# Altium PCB PCB.PcbDoc
Units mil, origin at the board's own origin, x right, y up, seen from the top; angles counter-clockwise.
Board outline 2055.12 x 472.44 mil, 2 copper layers (Top Layer, Bottom Layer), stack 61.811 mil thick; 6 components, 4 nets, 26 pads, 12 vias.
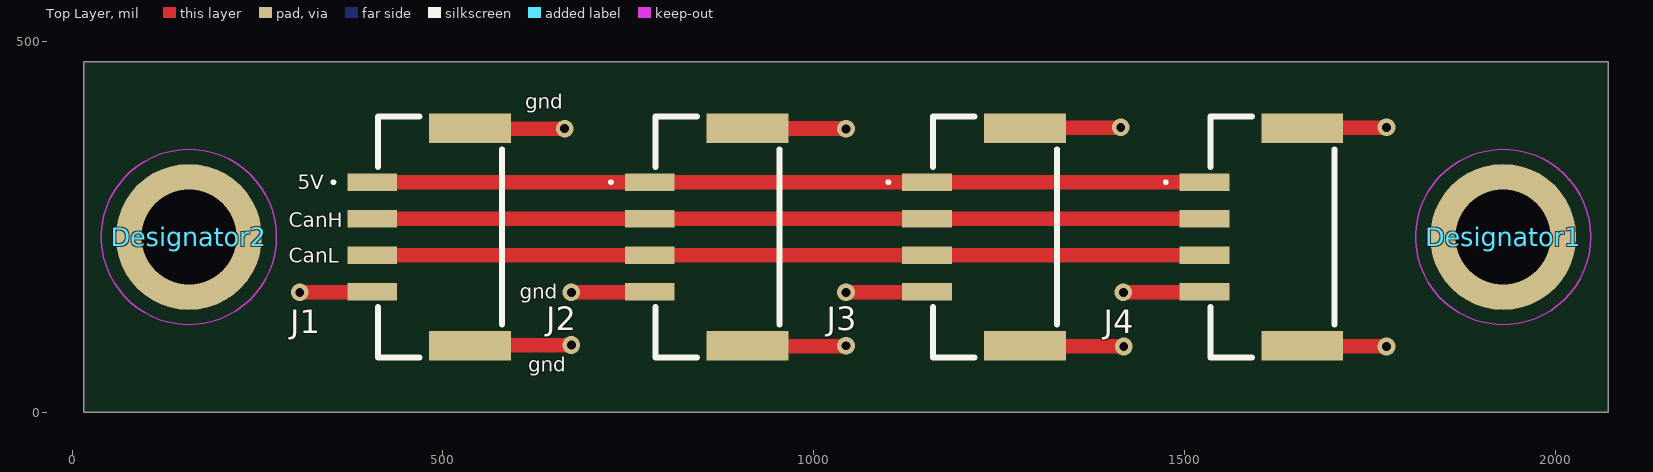
[diagram p0: Top Layer view]
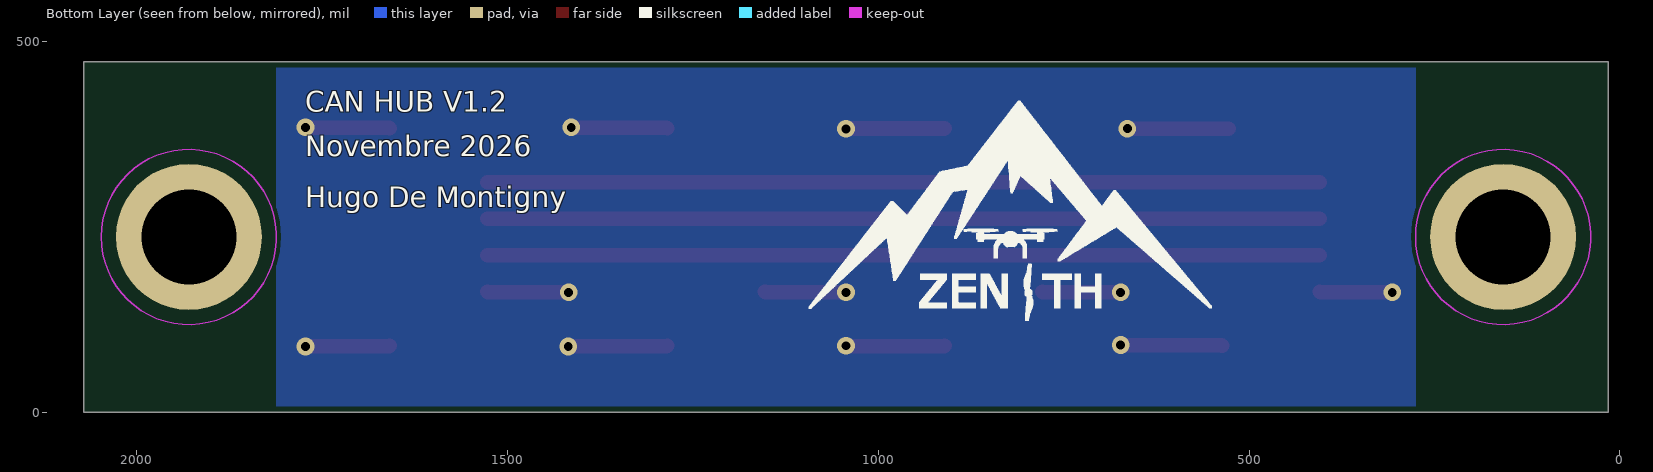
[diagram p1: Bottom Layer view, seen from below]
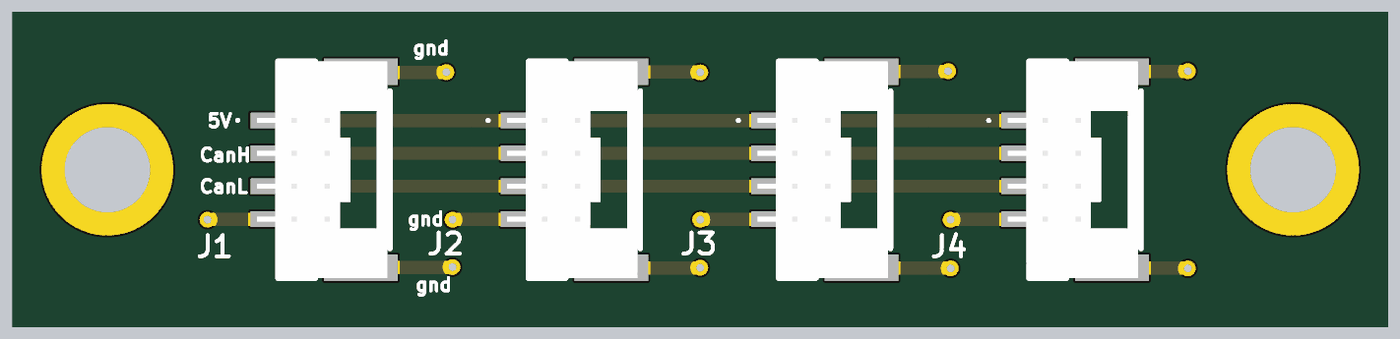
[diagram p2: 3D render of the assembled board from above, using the file's embedded part models]

## Layer stack, top to bottom
Top Solder: solder mask 0.5, Solder Resist, Dk 3.8
Top Layer: signal copper 1.378
Dielectric: core 59.0551, FR-4, Dk 4.5
Bottom Layer: signal copper 1.378
Bottom Solder: solder mask 0.5, Solder Resist, Dk 3.8

## Board outline
15.75,0 2070.87,0 2070.87,472.44 15.75,472.44

## Design rules (kind name [scope] priority, off if disabled: settings)
BoardOutlineClearance [All] p1: gap=7.87 ignorepadtopadclearanceinfootprint=FALSE
Clearance [All] p1: gap=5 ignorepadtopadclearanceinfootprint=FALSE except(9.84: Arc-Hole Track-Hole SMDPad-Hole THPad-Hole Via-Hole Fill-Hole Poly-Hole Region-Hole Text-Hole)
ComponentClearance [All] p1: gap=5 collisioncheckmode=3 verticalgap=5 showdistances=TRUE
DiffPairsRouting [All] p1: maxlimit=10 minlimit=5 mostfreqgap=5 toplayer_minwidth=5 toplayer_maxwidth=1000 toplayer_prefwidth=5 bottomlayer_minwidth=5 bottomlayer_maxwidth=1000 bottomlayer_prefwidth=5 maxuncoupledlength=500
Height [All] p1: minheight=0 maxheight=71497.94 prefheight=500
HoleSize [All] p1: absolutevalues=TRUE maxlimit=248.03 minlimit=11.81 maxpercent=80.000 minpercent=20.000
HoleToHoleClearance [All] p1: gap=9.84 allowstackedmicrovias=FALSE
MinimumAnnularRing [All] p1: minimumring=3
MinimumSolderMaskSliver [All] p1: minsoldermaskwidth=0
PlaneClearance [All] p1: clearance=5
PlaneConnect PlaneConnectPowerPads [InPadClass('PowerPads')] p1: planeconnectstyle=Direct reliefexpansion=20 reliefentries=4 reliefconductorwidth=10 reliefairgap=10
PlaneConnect [All] p2: pad.planeconnectstyle=Relief pad.reliefexpansion=11.81 pad.reliefentries=4 pad.reliefconductorwidth=5 pad.reliefairgap=5 via.planeconnectstyle=Direct via.reliefexpansion=11.81 via.reliefentries=4 via.reliefconductorwidth=5 via.reliefairgap=5
PolygonConnect PolygonConnectPowerPads [All vs (InPadClass('PowerPads'))] p1: connectstyle=Direct reliefconductorwidth=10 reliefentries=4 polygonreliefangle="90 Angle" airgapwidth=10
PolygonConnect [All] p2: thpad.connectstyle=Relief thpad.reliefconductorwidth=5 thpad.reliefentries=4 thpad.polygonreliefangle="90 Angle" thpad.airgapwidth=5 smdpad.connectstyle=Relief smdpad.reliefconductorwidth=5 smdpad.reliefentries=4 smdpad.polygonreliefangle="90 Angle" smdpad.airgapwidth=5 via.connectstyle=Direct via.reliefconductorwidth=5 via.reliefentries=4 via.polygonreliefangle="90 Angle" via.airgapwidth=5
RoutingVias [All] p1: holewidth=11.81 width=23.62 viastyle="Through Hole" minholewidth=11.81 minwidth=23.62 maxholewidth=23.62 maxwidth=259.84
SilkToSilkClearance [All] p1: silktosilkclearance=0
SilkToSolderMaskClearance [IsPad] p1: minsilkscreentomaskgap=3.94 clearancetoexposedcopper=TRUE
SolderMaskExpansion [All] p1: expansion=2.95 istentingtop=FALSE
SupplyNets "Schematic Supply Nets_1" [InNet('5V')] p1: voltage=0.000
SupplyNets "Schematic Supply Nets" [InNet('gnd')] p2: voltage=0.000
Width [All] p1: maxlimit=1000 minlimit=5 preferedwidth=5 minimp=50.000000 maximp=50.000000 favimp=50.000000
20 further rules are at their usual default settings.

## Classes and differential pairs
component class Schem: J1 J2 J3 J4

## Components (designator, comment, footprint, x,y, rotation, side; value= is the part's Value field where it differs from the comment)
Designator1 "Comment" "MH - Footprint" 1929.13,236.22 r0 top
Designator2 "Comment" "MH - Footprint" 157.48,236.22 r0 top
J1 "BM04B-GHS-TBT_LF__SN_" BM04BGHSTBTLFSN 492.13,236.22 r90 top
J2 "BM04B-GHS-TBT_LF__SN_" BM04BGHSTBTLFSN 866.14,236.22 r90 top
J3 "BM04B-GHS-TBT_LF__SN_" BM04BGHSTBTLFSN 1240.16,236.22 r90 top
J4 "BM04B-GHS-TBT_LF__SN_" BM04BGHSTBTLFSN 1614.17,236.22 r90 top

## Footprints (in the part's own frame and the unit in brackets; to place one, negate y for a bottom-side part, rotate by r counter-clockwise, add the part's x,y. Pads: shape width x height; smd on the part's side, far side on the other; paste and mask are expansions set on the pad)
BM04BGHSTBTLFSN [mm]
  rect 0.6x1.7 smd: 1(1.875,2.225) 2(0.625,2.225) 3(-0.625,2.225) 4(-1.875,2.225)
  rect 1x2.8 smd: 5(3.725,-1.125) 6(-3.725,-1.125)
  silkscreen extent -4.13,-2.22 4.13,3.6, body extent -4.13,-2.12 4.13,2.83, height 4.2
"MH - Footprint" [mm]
  round 5 hole 3.25: MH(0,0)
  Keep-Out Layer circle w0.05: c0,0 r3

## Part data
J1 J2 J3 J4: "Connector", Manufacturer_Name="JST (JAPAN SOLDERLESS TERMINALS)", Manufacturer_Part_Number=BM04B-GHS-TBT(LF)(SN), Mouser Part Number=306-BM04BGHSTBTLFSNN, Datasheet Link=https://g.componentsearchengine.com/ga/3Dstep, Height=4.2mm, Mouser Price/Stock=https://www.mouser.co.uk/ProductDetail/JST-Commercial/BM04B-GHS-TBTLFSN?qs=cdbOS8ANM9DuBD4arU9XYQ%3D%3D

## Via types
v1: diameter 23.62, hole 11.81, Top Layer to Bottom Layer, 12 vias

## Nets (pads, with @x,y where several pads share a name; then routed paths per layer and width w, separated by ;. In a path a pad name is that pad's centre, name@x,y a point inside that pad or via, vN(x,y) a via of type N, cw(c..) or ccw(c..) an arc to the next point about the centre after c; other vN are vias at no path point)
5V: J1.1 J2.1 J3.1 J4.1 | length 1122
  Top Layer w19.68: J1.1 J2.1 J3.1 J4.1
CanH: J1.2 J2.2 J3.2 J4.2 | length 1122
  Top Layer w19.68: J1.2 J2.2 J3.2 J4.2
CanL: J1.3 J2.3 J3.3 J4.3 | length 1122
  Top Layer w19.68: J1.3 J2.3 J3.3 J4.3
gnd: J1.4 J1.5 J1.6 J2.4 J2.5 J2.6 J3.4 J3.5 J3.6 J4.4 J4.5 J4.6 | length 1453.5
  Top Layer w19.68: v1(307.09,161.42) 307.58,161.91 404.04,161.91 J1.4 ; J1.5@527.56,381.89 v1@663.39,381.89 ; J1.6 536.91,90.06 672.74,90.06 v1(673.23,90.55) ; v1(673.23,161.42) 673.72,161.91 778.05,161.91 J2.4 ; J2.6 910.95,89.05 1043.02,89.05 v1@1043.54,88.54 ; J2.5 910.93,382.38 1042.82,382.38 v1(1043.31,381.89) ; v1(1043.31,161.42) 1043.8,161.91 1152.07,161.91 J3.4 ; J3.6 1284.96,89.05 1417.04,89.05 v1(1417.55,88.54) ; J3.5 1284.92,383.34 1413.14,383.34 v1(1413.61,383.81) ; v1(1417.32,161.42) 1417.82,161.91 1526.08,161.91 J4.4 ; J4.6 1658.98,89.05 1771.37,89.05 v1(1771.88,88.54) ; J4.5 1658.93,383.34 1771.41,383.34 v1(1771.88,383.81)
  other v1: 1043.31,89.57 663.88,382.38
pads on no net: Designator1.MH Designator2.MH

## Polygon pours and split planes (outlines as drawn)
gnd on Bottom Layer "GND_L02_P000" (solid, pour order 0): 275.59,472.44 1811.02,472.44 1811.02,0 275.59,0

## Silkscreen, mask and mechanical layers (free items; w line width, h text height)
Top Overlay:
  text "gnd" at 611.22,409.12 h19.68
  text "5V" at 304.13,300.2 h19.68
  text "CanH" at 292.32,249.02 h19.68
  text "CanL" at 292.32,201.77 h19.68
  text "gnd" at 603.35,153.21 h19.68
  text "gnd" at 615.16,54.79 h19.68
Bottom Overlay:
  drawing of 8 lines, arcs and shapes, not listed
  text "CAN HUB V1.2" at 1772.44,404.72 h27.56
  text "Novembre 2026" at 1772.44,345.01 h27.56
  text "Hugo De Montigny" at 1772.44,276.11 h27.56